# Altium PCB ESP32_With_USB_C.PcbDoc (part 3 of 3)
Units mil, origin at the board's own origin, x right, y up, seen from the top; angles counter-clockwise.
Board outline 2700 x 1000 mil, 4 copper layers (L1, L2, L3, L4), stack 61.583 mil thick; 63 components, 72 nets, 297 pads, 159 vias.
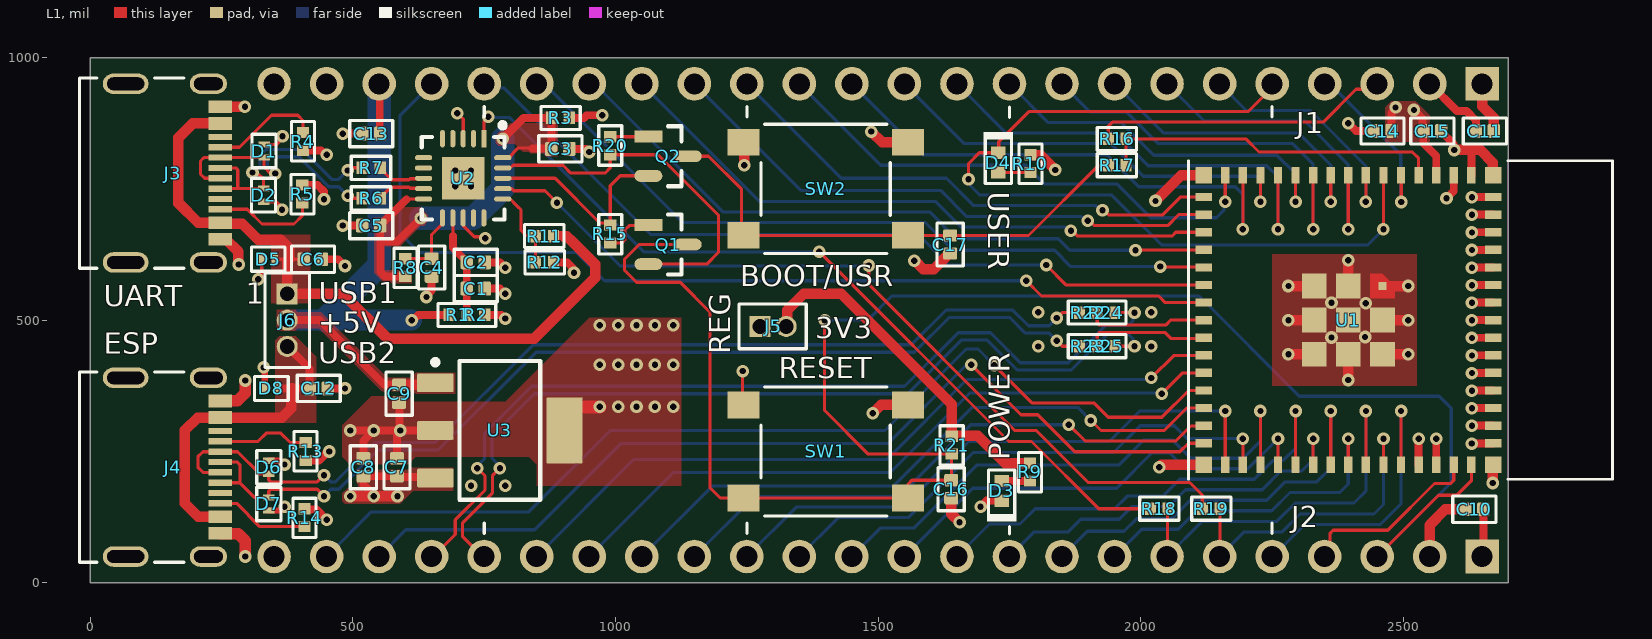
[diagram p0: L1 view]

## Via types
v1: diameter 24, hole 12, L1 to L4, tented both sides, 159 vias

## Nets (pads, with @x,y where several pads share a name; then routed paths per layer and width w, separated by ;. In a path a pad name is that pad's centre, name@x,y a point inside that pad or via, vN(x,y) a via of type N, cw(c..) or ccw(c..) an arc to the next point about the centre after c; other vN are vias at no path point) (continued)
+3V3_REG: C7.2 C8.2 J5.1 U3.3 | length 1188.4
  L1 w15: v1(540,165) 540,167.44 520,187.44 C8.2 C7.2 590,202.8 591.67,201.12 655.3,201.12 U3.3
  L1 w20: v1(495,165) v1(540,165) v1(585,165)
  L2 w40: 1180,460 1237,517 1277,517
  L2 w60: v1(585,165) 590,165 695,270 1120,270 1180,330 1180,460
+5V: C9.2 C13.2 J1.22 J6.2 R1.1 U3.1 | length 1235.5
  L1 w15: J6.2 437,500 560,377 560.2,377.2 C9.2 ; J1.22 551.1,948.9 551.1,856.1 C13.2 ; v1(612,500) 614.44,500 624.44,510 R1.1
  L1 w20: C9.2 653.62,377.2 U3.1
  L4 w40: J6.2 446,500 v1(612,500)
  L4 w45: 446,500 550,604 J1.22
+5V_VBUS1: C6.2 D5.1 J3.A4/B9 J3.B4/A9 J6.1 R11.2 | length 1401.3
  L1 w6: D5.1 379.15,616 C6.2
  L1 w20: J3.A4/B9 195.41,874.41 168,847 168,723 205.57,685.43 J3.B4/A9 249.64,683.43 289.57,683.43 320,653 363,653 379.15,636.85 379.15,616 375,611.85 J6.1 481,550 566,465 845,465 961,581 961,606.06 918.28,648.78 907.06,660 R11.2
+5V_VBUS2: C12.2 D8.1 J4.A4/B9 J4.B4/A9 J6.3 | length 633.7
  L1 w15: D8.1 385,370 C12.2 417.8,407.2 J6.3
  L1 w20: J4.B4/A9 205.59,125.59 180,151.18 180,290 204.57,314.57 J4.A4/B9 364.57,314.57 382.35,332.35 382.35,367.35 385,370
"+VCC _FTDI": C1.2 C2.2 R1.2 R2.2 U2.12 | length 195.6
  L1 w6: 690.31,660.32 U2.12
  L1 w15: 690.31,660.32 690.31,637.86 716.8,611.38 C2.2 C1.2 716.9,559.89 716.9,510.11 R1.2
BTN_GPIO0: C17.2 Q2.3 R17.1 SW2.3 SW2.4 | length 967.7
  L1 w6: Q2.3 1177,812 1240,749 1240,664.92 SW2.3 SW2.4 1556.71,661.2 C17.2 1786.2,661.2 1918.22,793.22 1936.21,793.22 R17.1
CHIP_PU: C16.2 J2.3 Q1.3 R21.1 SW1.3 SW1.4 U1.45 | length 3588.4
  L1 w6: Q1.3 1045,644 1017,616 1017,595 1040,572 1123,572 1180,515 1180,181 1199.58,161.42 SW1.3 SW1.4 1557,161.92 1557,188 1564.2,195.2 C16.2 1639.5,195.7 1639.5,244.49 R21.1 1481.01,244.99 1398,328 v1(1398,500) ; J2.3 2566.64,166.64 2601.64,166.64 2629.29,194.29 U1.45
  L4 w6: v1(1398,500) 1480,500 1526,546 2111,546 2302,355 2568,355 2591,332 2591,191 J2.3
CON1_USB_N: D1.1 J3.A7 J3.B7 R6.1 | length 482.6
  L1 w6.03: J3.A7 217.92,770.08 210,778 210,803 216.45,809.45 J3.B7 D1.1 ; D1.1 331,792 344,779 v1(352,779) ; v1(490,737) 495,732 R6.1
  L4 w6.03: v1(352,779) 352,780 337.51,794.49 337.51,807.47 341.05,811 396.72,811 453.74,753.99 473.01,753.99 v1(490,737)
CON1_USB_P: D2.1 J3.A6 J3.B6 R7.1 | length 468.1
  L1 w6.03: J3.B6 247.69,750.45 280,750.45 ; J3.A6 277.24,789.76 281,786 281,751.45 280,750.45 ; v1(309,781) 317,781 330,768 D2.1 329.95,750.45 280,750.45 ; v1(490,785) 495,790 R7.1
  L4 w6.03: v1(309,781) 310,781 323.49,794.49 323.49,813.28 335.24,825.03 402.53,825.03 459.55,768.01 473.01,768.01 v1(490,785)
CON2_USB_N: D6.1 J4.A7 J4.B7 R22.1 | length 1948.3
  L1 w6.03: J4.A7 214.76,210.24 205,220 205,240 214.6,249.6 J4.B7 280.4,249.6 322.5,207.5 D6.1 340,195.55 343.53,192.01 432.01,192.01 v1(445,205) ; v1(1840,504) 1850.36,514.36 R22.1
  L4 w6.03: v1(445,205) 457.99,192.01 467.01,192.01 541.99,266.99 657.14,266.99 843.19,453.03 1563.19,453.03 1629.19,519.03 1756.49,519.03 1786.15,489.38 1825.37,489.38 v1(1840,504)
CON2_USB_P: D7.1 J4.A6 J4.B6 R23.1 | length 1903.3
  L1 w6.03: J4.B6 284.45,190.55 ; J4.A6 280.08,229.92 285,225 285,191.1 284.45,190.55 ; v1(445,165) 432.01,177.99 343.53,177.99 340,174.45 D7.1 312.5,162.5 284.45,190.55 ; v1(1839.99,460.73) 1850.35,450.36 R23.1
  L4 w6.03: v1(445,165) 457.99,177.99 472.83,177.99 547.8,252.95 662.96,252.95 849,439 1569,439 1635,505 1750.68,505 1780.34,475.35 1825.37,475.35 v1(1839.99,460.73)
CON_ESP_USB_N: J2.21 R24.1 | length 1714
  L1 w6.03: J2.21 652.99,50 695,92.01 695,119.84 695.97,120.81 695.97,120.97 751.49,176.48 751.49,203.51 v1(737,218) ; R24.1 v1(1987.99,514.36)
  L4 w6.03: v1(737,218) 737,222.76 750.89,236.65 750.89,284.89 840.03,374.03 1550.19,374.03 1652.19,476.03 1713.81,476.03 1770.81,419.03 1862.01,419.03 1932.98,490 1976,490 1985.33,499.33 1985.33,511.7 v1(1987.99,514.36)
CON_ESP_USB_P: J2.20 R25.1 | length 1689.7
  L1 w6.03: J2.20 747.01,50 709.03,87.99 709.03,114.03 710,115 710,115.16 765.51,170.67 765.51,203.51 v1(780,218) ; R25.1 v1(1987.98,450.36)
  L4 w6.03: v1(780,218) 780,222.31 764.92,237.39 764.92,279.08 845.84,360 1556,360 1658,462 1708,462 1765,405 1867.83,405 1938.8,475.97 1974.03,475.97 1984.96,465.04 1984.96,453.39 v1(1987.98,450.36)
CON_GPIO0: J1.3 R16.1 | length 569.6
  L1 w6: R16.1 1937.99,868.99 1946,877 2347,877 2409.67,939.67 2439.67,939.67 J1.3
"DTR _FTDI": Q2.2 R15.2 U2.18 | length 397.1
  L1 w6: U2.18 813,770 885,770 970.17,684.83 986.18,684.83 R15.2 990,684.83 990,756 1009,775 1062.18,775 Q2.2
ESP_USB_N: R22.2 R24.2 U1.23 | length 227.4
  L1 w6.03: R22.2 1917,495.64 1921.99,490.65 2047.27,490.65 2056.99,500.36 2119.09,500.36 U1.23
ESP_USB_P: R23.2 R25.2 U1.24 | length 245.7
  L1 w6.03: R23.2 1916.98,471.6 1921.99,476.62 2045.74,476.62 2056.99,465.36 2118.28,465.36 U1.24 2111.57,466.54 U1.24@2106.72,471.39
FTDI_USB_N: R6.2 U2.9 | length 93.2
  L1 w6.03: R6.2 552.01,733.18 571.97,753.14 606.99,753.14 609.15,750.99 633.91,750.99 U2.9
FTDI_USB_P: R7.2 U2.8 | length 93.9
  L1 w6.03: R7.2 552.01,788.82 573.65,767.17 606.99,767.17 609.15,769.33 633.91,769.33 U2.8
GND: C1.1 C2.1 C3.1 C4.1 C5.1 C6.1 C7.1 C8.1 C9.1 C10.1 C11.1 C12.1 C13.1 C14.1 C15.1 C16.1 C17.1 D1.2 D2.2 D3.1 D5.2 D6.2 D7.2 D8.2 J1.1 J1.23 J2.2 J2.24 J3.A1/B12 J3.B1/A12 J3.S1 J3.S2 J3.S3 J3.S4 J4.A1/B12 J4.B1/A12 J4.S1 J4.S2 J4.S3 J4.S4 R4.2 R5.2 R12.1 R13.2 R14.2 SW1.1 SW1.2 SW2.1 SW2.2 U1.1 U1.2 U1.42 U1.43 U1.46 U1.47 U1.48 U1.49 U1.50 U1.51 U1.52 U1.53 U1.54 U1.55 U1.56 U1.57 U1.58 U1.59 U1.60 U1.61 U1.62 U1.63 U1.64 U1.65 U1.66 U1.67 U1.68 U1.69 U1.70 U1.71 U1.72 U1.73 U2.3 U2.13 U2.21 U3.2 U3.4 | length 3985
  L1 w6: v1(320,578) 326.5,584.5 D5.2 ; D2.2 354.5,725.5 365,715 v1(365,710) ; D1.2 355.5,834.5 366,845 v1(366,850) ; v1(699,894) 710,883 U2.3 ; U2.13 710,680 717,673 720.66,669.34 731.32,658.68 749.32,658.68 v1(752,656) ; v1(1242,403) 1242,340.09 SW1.1 ; 2629.29,823.29 2630,824
  L1 w12: v1(330,410) 332.5,407.5 D8.2 ; D7.2 362.5,137.5 v1(370,145) ; D6.2 362.5,232.5 v1(370,225)
  L1 w15: R5.2 432.99,757.01 445,745 v1(445,730) ; R4.2 439.57,822.99 447.56,815 v1(450,815) ; R14.2 409.63,139.37 430.63,139.37 v1(450,120) ; R13.2 435.56,232.99 452.56,250 v1(455,250) ; C6.1 472,616 v1(485,603) ; C12.1 v1(485,370) ; v1(481,680) C5.1 ; v1(481,855) C13.1 ; v1(495,290) v1(540,290) ; C8.1 520,270 v1(540,290) ; C7.1 584,281.56 590,287.56 v1(590,290) ; C9.1 589,341.8 589,291 v1(590,290) ; v1(640,544) 640,546.44 650,556.44 C4.1 ; U3.2 v1(590,290) ; C1.1 780,560 v1(790,550) ; C2.1 780,610 v1(790,600) ; R12.1 908.06,610 919.28,598.78 919.28,591.72 v1(921,590) ; U3.4 903.03,309.05 U3.4@928.98,335 ; C3.1 944,826 v1(950,820) ; v1(1695,145) 1706.3,156.3 D3.1 ; v1(2395,875) 2410,860 C14.1 ; U1.42 v1(2528.9,274.5) ; U1.43 v1(2562.36,274.5) ; C15.1 2572.2,858.62 2595.28,835.55 2595.28,825.72 v1(2597,824) ; v1(2582,732) 2595.83,745.83 U1.2 ; U1.1 2629.29,823.29 ; v1(2630,265) 2630.37,265.37 2670.26,265.37 U1.46 ; v1@2630.75,299.21 U1.47 ; v1@2630.75,332.68 U1.48 ; v1@2630.75,366.14 U1.49 ; v1@2630.75,399.61 U1.50 ; v1@2630.75,433.07 U1.51 ; v1@2630.75,466.54 U1.52 ; v1@2630.75,500 U1.53 ; v1@2630.75,533.46 U1.54 ; v1@2630.75,566.93 U1.55 ; v1@2630.75,600.39 U1.56 ; v1@2630.75,633.86 U1.57 ; v1@2630.75,667.32 U1.58 ; v1@2630.75,700.79 U1.59 ; v1@2630.75,734.25 U1.60 ; v1(540,290) v1(590,290)
  L1 w20: J3.B1/A12 258.14,653.94 282.23,629.84 282.23,606.77 v1(283,606) ; J3.A1/B12 v1@293.94,905.91 ; SW2.1 1245,837.09 v1(1245,795) ; v1(1487,859) 1507.42,838.58 SW2.2 ; v1(1490,323) 1505.58,338.58 SW1.2 SW1.2@1565,347.09 ; v1(1569,613) 1570.08,613 1586.08,597 1605.83,597 1633.81,624.98 1635.19,624.98 C17.1 ; C16.1 1639,131 v1(1655,115) ; v1(2028,727) 2028.82,727 2077.41,775.59 U1.63 ; v1(2035,220) 2039.41,224.41 U1.64 ; v1(2281.04,564.96) v1(2281.04,564.96) U1.71 ; v1(2281.04,435.04) U1.73 ; v1(2281.04,500) U1.72 ; v1(2395.04,386) U1.70 ; U1.69 v1(2395.04,614) ; U1.68 v1(2509.04,435.04) ; U1.67 v1(2509.04,500) ; U1.66 v1(2509.04,564.96) ; J2.2 2550,110 2580,140 C10.1 ; v1(2597,824) 2630,824 2646,824 2670,800 2670,776.22 U1.62 ; J1.1@2657.28,942.72 J1.1 2650,907 2672,885 2672,860.2 C11.1 ; v1(2670,190) 2670,223.78 U1.65
  L1 w22: J4.B1/A12 248.64,93.09 281.91,93.09 295,80 v1(295,50) ; J4.A1/B12 248.14,346.56 280.36,346.56 295,361.21 v1(295,385)
  L1 w25: U3.4@928.98,335 v1(970,335)
  other v1: 725,185 790,185 2630.37,298.84 2630.37,332.3 1005,335 1040,335 1075,335 1110,335 2630.37,365.77 2630.37,399.23 970,415 1005,415 1040,415 1075,415 1110,415 2630.37,432.7 1805,450 2020,450 2630.37,466.16 2363,467 2427,468 970,490 1005,490 1040,490 1075,490 1110,490 2630.37,499.63 1805,515 2020,515 2428,532 2363,533 2630.37,533.09 2630.37,566.56 2630.37,600.02 2630.37,633.48 2630.37,666.95 2630.37,700.41 2630.37,733.88 695,755 725,755 695,785 725,785 294.47,906.44
GPIO0: R16.2 R17.2 U1.4 | length 654.8
  L1 w6: R17.2 R16.2 2200,845 2225,820 2517,820 2529,808 2529,775.69 U1.4
GPIO1: J1.4 U1.5 | length 342.2
  L1 w6: U1.5 2495.72,775.31 2495.72,725.28 v1(2496,725)
  L4 w6: J1.4 2360,950 2495,815 2495,726 v1(2496,725)
GPIO2: D4.1 J1.5 U1.6 | length 1648.3
  L1 w6: v1(1672,768) 1672,798 1692.7,818.7 D4.1 1729.65,819.35 1729.65,839.65 1787,897 2204,897 2250,943 J1.5 ; v1@2461.97,673.04 U1.6
  L4 w6: v1(1672,768) 1674.68,765.32 1674.68,757.32 1694,738 1945,738 2040,643 2431.93,643 v1(2461.93,673)
GPIO3: J1.6 U1.7 | length 462.1
  L1 w6: v1@2428,725 v1(2428.5,725.5) U1.7
  L4 w6: J1.6 2201,899 2323,899 2428.5,793.5 v1(2428.5,725.5)
GPIO4: J1.7 U1.8 | length 634.4
  L1 w6: v1(2395,673) v1(2395,673) U1.8
  L4 w6: J1.7 2121,879 2312,879 2395,796 v1(2395,673)
GPIO5: J1.8 U1.9 | length 595.6
  L1 w6: v1(2361.57,725.5) U1.9
  L4 w6: J1.8 2044,856 2301,856 2361.57,795.43 v1(2361.57,725.5)
GPIO6: J1.9 U1.10 | length 768
  L1 w6: v1(2328.07,673) U1.10
  L4 w6: J1.9 1904,896 1973,896 2033,836 2289,836 2328.07,796.93 v1(2328.07,673)
GPIO7: J1.10 U1.11 | length 718.7
  L1 w6: v1(2294.65,725.5) U1.11
  L4 w6: J1.10 1824,876 1963,876 2025,814 2259,814 2294.65,778.35 v1(2294.65,725.5)
GPIO8: J1.11 U1.12 | length 886.9
  L1 w6: v1@2261.18,673.04 U1.12
  L4 w6: J1.11 1744,856 1952,856 2014,794 2240,794 2261.14,772.86 v1(2261.14,673)
GPIO9: J1.12 U1.13 | length 845.3
  L1 w6: v1(2227.72,725.5) U1.13
  L4 w6: J1.12 1664,836 1943,836 2005,774 2221,774 2227.72,767.28 v1(2227.72,725.5)
GPIO10: J1.13 U1.14 | length 1000.6
  L1 w6: v1@2194.25,673.04 U1.14
  L4 w6: J1.13 1585,815 1935,815 1996,754 2180,754 2194.21,739.79 v1(2194.21,673)
GPIO11: J1.14 U1.15 | length 987.3
  L1 w6: v1(2160.79,725.5) U1.15
  L4 w6: J1.14 1505,795 1781,795 1817,759 1955,759 2019,695 2144.14,695 2158.11,708.97 2158.11,722.83 v1(2160.79,725.5)
GPIO12: J1.15 U1.16 | length 987.2
  L1 w6: v1(1927,709) 1930.79,709 1939.79,700 2041,700 2075.25,734.25 U1.16
  L4 w6: J1.15 1430,770 1630,770 1682,718 1914.21,718 1923.21,709 v1(1927,709)
GPIO13: J1.16 U1.17 | length 1089.9
  L1 w6: v1(1899,689) 1902.79,689 1911.79,680 2051,680 2071.79,700.79 U1.17
  L4 w6: J1.16 1353,747 1619,747 1669,697 1887.21,697 1895.21,689 v1(1899,689)
GPIO14: J1.17 U1.18 | length 1192.6
  L1 w6: v1(1867,670) 1869.86,670 1879.86,660 2059.35,660 2066.68,667.32 U1.18
  L4 w6: J1.17 1274,726 1609,726 1658,677 1856.21,677 1863.21,670 v1(1867,670)
GPIO15: J1.18 U1.19 | length 1301.1
  L1 w6: v1(1990,633) 1990.43,633.43 2119.02,633.43 U1.19
  L4 w6: J1.18 960,950 1204,706 1598,706 1649,655 1843,655 1865,633 v1(1990,633)
GPIO16: J1.19 U1.20 | length 1414.3
  L1 w6: v1(2037,602) 2037.8,601.2 2118.65,601.2 U1.20
  L4 w6: J1.19 864,950 1128,686 1589.72,686 1642.72,633 1836,633 1867,602 v1(2037,602)
GPIO17: J1.20 U1.21 | length 1528
  L1 w6: v1(1820,605) 1858.29,566.71 U1.21@2119.23,566.71
  L4 w6: J1.20 758.23,941.77 788.23,941.77 1067,663 1576,663 1634,605 v1(1820,605)
GPIO18: J1.21 U1.22 | length 1895.3
  L1 w6: v1(1782,575) 1811,546 2034,546 2046.54,533.46 U1.22
  L4 w6: J1.21@651,949 J1.21 596,896 595.86,896 590,890.14 590,665 626,629 925,629 979,575 v1(1782,575)
GPIO21: J2.19 U1.25 | length 1428.1
  L1 w6: v1(2020,390) 2062.54,432.54 2118.91,432.54 U1.25
  L4 w6: J2.19 1035,235 1517,235 1669,387 2007.14,387 2007.46,387.32 2017.32,387.32 v1(2020,390)
GPIO26: J2.18 U1.26 | length 1315.1
  L1 w6: v1(2040,360) 2079.61,399.61 U1.26
  L4 w6: J2.18 1110,210 1523,210 1674,361 2039,361 v1(2040,360)
GPIO33: J2.17 U1.28 | length 1223
  L1 w6: v1(1905,309) 1905.18,309 1924.18,290 2045,290 2087.68,332.68 U1.28
  L4 w6: J2.17 1184,184 1529,184 1679,334 1880,334 v1(1905,309)
GPIO34: J2.16 U1.29 | length 1098.4
  L1 w6: v1(1863,301) 1894,270 2066.72,270 2095.27,298.56 2118.79,298.56 U1.29
  L4 w6: J2.16 1264,164 1539,164 1676,301 v1(1863,301)
GPIO35: J2.15 U1.31 | length 1128.1
  L1 w6: U1.31 v1(2160.79,326.96)
  L4 w6: J2.15 1344,144 1548,144 1673,269 1940,269 1997.96,326.96 v1(2160.79,326.96)
GPIO36: J2.14 U1.32 | length 1007.6
  L1 w6: U1.32 v1(2194.25,274.5)
  L4 w6: J2.14 1424,124 1557,124 1681,248 1948,248 1999,299 2064,299 2088.5,274.5 v1(2194.25,274.5)
GPIO37: J2.13 U1.33 | length 1057.6
  L1 w6: U1.33 v1@2227.72,326.96
  L4 w6: J2.13 1504,104 1568,104 1688,224 1958,224 2006,272 2060,272 2095,237 2195,237 2227.76,269.76 v1(2227.76,327)
GPIO38: J2.12 U1.34 | length 879.1
  L1 w6: U1.34 v1(2261.18,274.5)
  L4 w6: J2.12 1603.17,103.17 1680,180 1954,180 2021,247 2055,247 2085,217 2203.69,217 v1(2261.18,274.5)
GPIO39: J2.11 U1.35 | length 903.2
  L1 w6: U1.35 v1@2294.65,326.96
  L4 w6: J2.11 1712,112 1770,112 1799,141 1950,141 1974,165 2042,165 2074,197 2216,197 2252,233 2271,233 2294.69,256.69 v1(2294.69,327)
GPIO40: J2.10 U1.36 | length 744.8
  L1 w6: U1.36 v1(2328.11,274.5)
  L4 w6: J2.10 1797,97 1862,97 1886,121 1959,121 1983,145 2053,145 2085,177 2231,177 2267,213 2307,213 2328.11,234.11 v1(2328.11,274.5)
GPIO41: J2.9 U1.37 | length 792.4
  L1 w6: U1.37 v1(2361.61,327)
  L4 w6: J2.9 1898,98 1968,98 1992,122 2059,122 2094,157 2240,157 2275,192 2335,192 2361.61,218.61 v1(2361.61,327)
GPIO42: J2.8 U1.38 | length 638.8
  L1 w6: U1.38 v1(2395.04,274.5)
  L4 w6: J2.8 2002,102 2071,102 2106,137 2249,137 2284,172 2379,172 2395.04,188.04 v1(2395.04,274.5)
GPIO45: J2.5 U1.41 | length 566.2
  L1 w6: U1.41 v1@2495.43,326.96
  L4 w6: J2.5 2251,50 2312,111 2456,111 2495.47,150.47 v1(2495.47,327)
GPIO46: J2.4 U1.44 | length 355.3
  L1 w6: J2.4 2360.33,60.33 2360.33,94.47 2365.86,100 2470,100 2559.11,189.11 2589.97,189.11 2595.83,194.97 U1.44
GPIO47: J2.23 U1.27 | length 1908.1
  L1 w6: v1(1721,414) 1792.55,342.45 1910.45,342.45 1937.89,315 2040,315 2091.14,366.14 U1.27
  L4 w6: J2.23 535,135 835,135 990,290 1513,290 1668,445 1690,445 v1(1721,414)
GPIO48: J2.22 U1.30 | length 1796
  L1 w6: v1(1677,415) 1772,320 1804,320 1874.59,249.41 2074.41,249.41 2090.75,265.75 U1.30
  L4 w6: J2.22 601,101 846,101 1010,265 1518,265 1665.32,412.32 1674.32,412.32 v1(1677,415)
NetC4_2: C4.2 R8.2 U2.11 | length 136.2
  L1 w6: R8.2 600.1,617.11 649.9,617.11 C4.2 650,663 670.06,683.06 670.4,683.06 670.63,683.28 U2.11
NetD3_2: D3.2 R9.1 | length 54.1
  L1 w15: D3.2 1735.15,193.85 1788.85,193.85 R9.1
NetD4_2: D4.2 R10.1 | length 61.1
  L1 w6: D4.2 1729.15,781.15 1789.85,781.15 R10.1
NetJ3_A5: J3.A5 R4.1 | length 209.7
  L1 w6: J3.A5 284.13,829.13 345,890 395,890 405,880 R4.1
NetJ3_B5: J3.B5 R5.1 | length 198.6
  L1 w6: J3.B5 298.98,711.02 300,710 327,683 388,683 404,699 R5.1
NetJ4_A5: J4.A5 R13.1 | length 176.3
  L1 w6: J4.A5 295,269.29 319.29,269.29 335,285 362.91,285 380.91,267.01 R13.1
NetJ4_B5: J4.B5 R14.1 | length 186.2
  L1 w6: J4.B5 278.82,151.18 323.01,106.99 R14.1 R14.1@402.67,101.66
NetQ1_1: Q1.1 R15.1 | length 106
  L1 w6: R15.1@995.63,652.62 R15.1 1012.14,646.99 1018,652.85 1018,672 1026,680 1061.18,680 Q1.1
NetQ2_1: Q2.1 R20.1 | length 72.7
  L1 w6: R20.1 990.2,849.2 1062.38,849.2 Q2.1
"RTS _FTDI": Q1.2 R20.2 U2.19 | length 710.3
  L1 w6: U2.19 799.69,789.68 804.84,794.84 813,794.84 813.16,795 900,795 915,780 980,780 990,790 R20.2 1081.01,814.99 1196,700 1196,629 1173.6,606.6 Q1.2 Q1.2@1062,607.18
"RXD _FTDI": R18.2 U2.1 | length 1614.2
  L1 w6: U2.1 749.37,878.37 v1(758,887) ; v1(1388,630) 1749,269 1792,269 1920,141 R18.2
  L4 w6: v1(758,887) 759,886 798,886 1054,630 v1(1388,630)
"TXD _FTDI": R19.2 U2.17 | length 1621.1
  L1 w6: U2.17 802.23,750.32 806.27,746.27 865.73,746.27 v1(888.5,723.5) ; v1(1482,604) 1482,568 1760,290 1801,290 1900,191 2093,191 2116.99,167.01 R19.2
  L4 w6: v1(888.5,723.5) 1009,603 1481,603 v1(1482,604)
U0RXD: J2.6 R19.1 U1.40 | length 620
  L1 w6: J2.6 2150.5,50.5 2150.5,140.5 R19.1 ; U1.40 v1(2461.97,274.5)
  L4 w6: J2.6 2197,97 2269,97 2303,131 2444,131 2461.97,148.97 v1(2461.97,274.5)
U0TXD: J2.7 R18.1 U1.39 | length 777
  L1 w6: J2.7 2051,51 2051,140 R18.1 ; U1.39 v1(2428.54,327)
  L4 w6: J2.7 2117,117 2259,117 2294,152 2406,152 2428.54,174.54 v1(2428.54,327)
VBUS_SENSE: R11.1 R12.2 U2.16 | length 164.7
  L1 w6: U2.16 799.37,730.63 813,717 820,710 820,671 830,661 846.99,661 R11.1 R12.2
pads on no net: J1.24 J3.A8 J3.B8 J4.A8 J4.B8 U2.2 U2.4 U2.5 U2.6 U2.7 U2.14 U2.15

## Polygon pours and split planes (outlines as drawn)
+3V3 on L1 "+3V3_L01_P016" (solid, pour order 16): 2465,905 2477,917 2523,917 2550,890 2550,840 2465,840
GND on L1 "GND_L01_P010" (solid, pour order 10): 950,505 1125,505 1125,185 850,185 850,225 835,240 620,240 605,225 495,225 480,240 480,300 535,355 605,355 615,345 790,345
GND on L1 "GND_L01_P008" (solid, pour order 8): 2525,625 2525,375 2250,375 2250,625
+5V_VBUS2 on L1 "+5V_VBUS2_L01_P007" (solid, pour order 7): 360,470 390,470 430,430 430,305 352,305 352,462
+5V_VBUS1 on L1 "+5V_VBUS1_L01_P006" (solid, pour order 6): 345,532 419,532 419,663 345,663
+5V on L1 "+5V_L01_P005" (solid, pour order 5): 615,395 620,400 695,400 695,360 620,360 610,365 555,365 435,485 395,485 390,480 355,480 355,520 390,520 395,515 440,515 565,390 610,390
+3V3_REG on L1 "+3V3_REG_L01_P004" (solid, pour order 4): 480,170 490,180 510,180 509.66,187.88 507,189.66 507,215 529,215 540,215 550,215 570.45,215 591.42,215 601.9,215 607.36,215.92 610.66,216.47 612.02,219.04 651.08,219.07 691,219.04 691,176 691,175 690,175 615,175 590,150 485,150 480,155
"+3V3 _FTDI" on L1 "+3V3__FTDI_L01_P003" (solid, pour order 3): 541,666 541,589 556,574 570,574 574,570 612,570 612,595 561,595 561,641 590,641 629,680 636,680 643,687 643,701 629,715 597,715 594,715 593,715 592,715 588,715 574,715 554,695 540,695 540,666
"+3V3 _FTDI" on L1 "+3V3__FTDI_L01_P002" (solid, pour order 2): 780,860 785,860 800,875 865,875 865,897 890,897 890,812 867,812 865,814 865,818 838,818 835,821 823,821 808,836 795,836 791,832 777,832 772,837 772,852
GND on L2 "GND_L02_P015" (solid, pour order 15): 20,20 2680,20 2680,980 20,980
+3V3 on L2 "+3V3_L02_P013" (solid, pour order 13): 2680,20 2680,980 920,980 920,860 1000,860 1180,680 1200,680 1200,620 1260,620 1300,580 1300,500 1360,500 1360,640 1400,680 1780,680 1860,760 2500,760 2520,740 2520,200 2440,120 2320,120 2320,20
+3V3_REG on L2 "+3V3_REG_L02_P014" (solid, pour order 14): 655,135 695,175 695,220 515,220 480,185 480,135
GND on L3 (split plane): 2699.95,0.05 0.05,0.05 0.05,999.95 2699.95,999.95

## Silkscreen, mask and mechanical layers (free items; w line width, h text height)
Top Overlay:
  lines w6: 750,94 750,114 ; 750,887 750,907 ; 1250,94 1250,114 ; 1250,887 1250,907 ; 1750,93 1750,107 ; 1750,886 1750,906 ; 2250,94 2250,114 ; 2250,887 2250,907
  text "J1" at 2296,856 h40
  text "USER" at 1710,744 h40 r270
  text "BOOT/USR" at 1237,565 h40
  text "USB1" at 435,532 h40
  text "UART" at 26,526 h40
  text "+5V" at 434,476 h40
  text "3V3" at 1380,466 h40
  text "ESP" at 26,436 h40
  text "REG" at 1218,435 h40 r90
  text "USB2" at 434,418 h40
  text "RESET" at 1311,389 h40
  text "POWER" at 1751,233 h40 r90
  text "J2" at 2286,106 h40
Bottom Overlay:
  text "NC" at 369,884 h40 r90
  text "GND" at 469,884 h40 r90
  text "5V" at 569,884 h40 r90
  text "I18" at 674,884 h40 r90
  text "I17" at 769,884 h40 r90
  text "I16" at 869,884 h40 r90
  text "I15" at 969,884 h40 r90
  text "I14" at 1074,884 h40 r90
  text "I13" at 1169,884 h40 r90
  text "I12" at 1269,884 h40 r90
  text "I11" at 1369,884 h40 r90
  text "I10" at 1474,884 h40 r90
  text "I09" at 1569,884 h40 r90
  text "I08" at 1669,884 h40 r90
  text "I07" at 1769,884 h40 r90
  text "I06" at 1874,884 h40 r90
  text "I05" at 1969,884 h40 r90
  text "I04" at 2069,884 h40 r90
  text "I03" at 2169,884 h40 r90
  text "I02" at 2274,884 h40 r90
  text "I01" at 2369,884 h40 r90
  text "I00" at 2469,884 h40 r90
  text "3V3" at 2569,884 h40 r90
  text "GND" at 2674,884 h40 r90
  text "<---PIN1--->" at 2669,739 h40 r90
  text "<C> 2026 MOHAMED RIYAS" at 1774,535 h40
  text "GND" at 369,269 h40 r90
  text "IO47" at 469,269 h40 r90
  text "IO48" at 569,269 h40 r90
  text "USB-" at 669,269 h40 r90
  text "USB+" at 769,269 h40 r90
  text "IO21" at 869,269 h40 r90
  text "IO26" at 969,269 h40 r90
  text "IO33" at 1069,269 h40 r90
  text "IO34" at 1169,269 h40 r90
  text "IO35" at 1269,269 h40 r90
  text "IO36" at 1369,269 h40 r90
  text "IO37" at 1469,269 h40 r90
  text "IO38" at 1569,269 h40 r90
  text "IO39" at 1669,269 h40 r90
  text "IO40" at 1769,269 h40 r90
  text "IO41" at 1869,269 h40 r90
  text "IO42" at 1969,269 h40 r90
  text "TXD" at 2069,269 h40 r90
  text "RXD" at 2169,269 h40 r90
  text "IO45" at 2269,269 h40 r90
  text "IO46" at 2369,269 h40 r90
  text "EN" at 2469,269 h40 r90
  text "GND" at 2569,269 h40 r90
  text "3V3" at 2669,269 h40 r90
Board Shape:
  the board outline again, w20

## Text inside footprints (layer, text, board x,y; h text height)
J1: Bottom Overlay "1" at 2636,1014 h40 r270
J2: Bottom Overlay "1" at 2639,-28 h40 r270
J6: Top Overlay "1" at 296,531 h40